# Altium PCB Mains_Board.PcbDoc
Units mil, origin at the board's own origin, x right, y up, seen from the top; angles counter-clockwise.
Board outline 2250.93 x 2125.99 mil, 2 copper layers (Top Layer, Bottom Layer), stack 61.811 mil thick; 23 components, 20 nets, 68 pads, 12 vias.
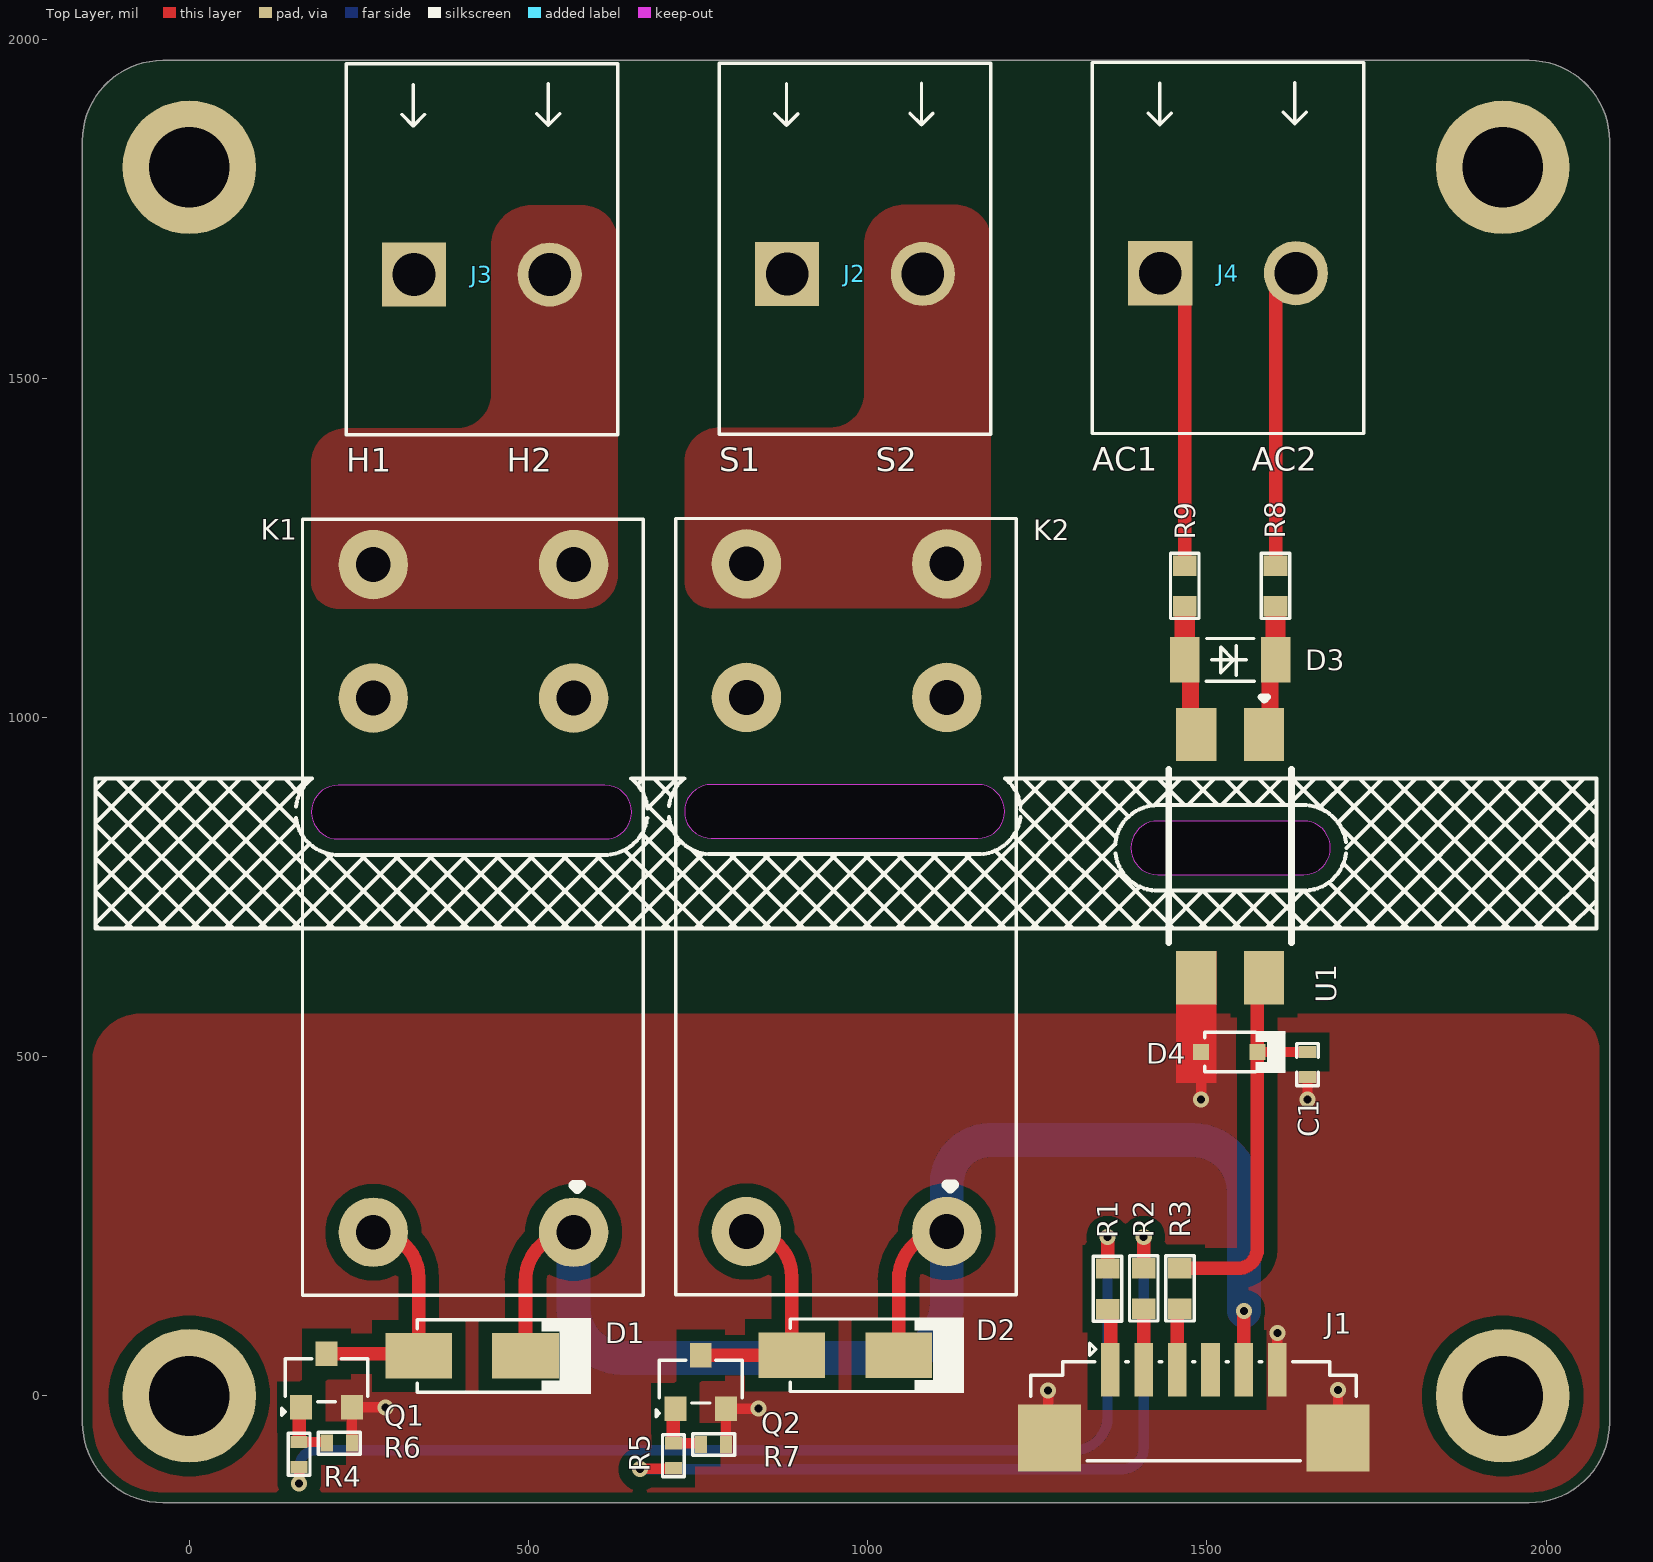
[diagram p0: Top Layer view]
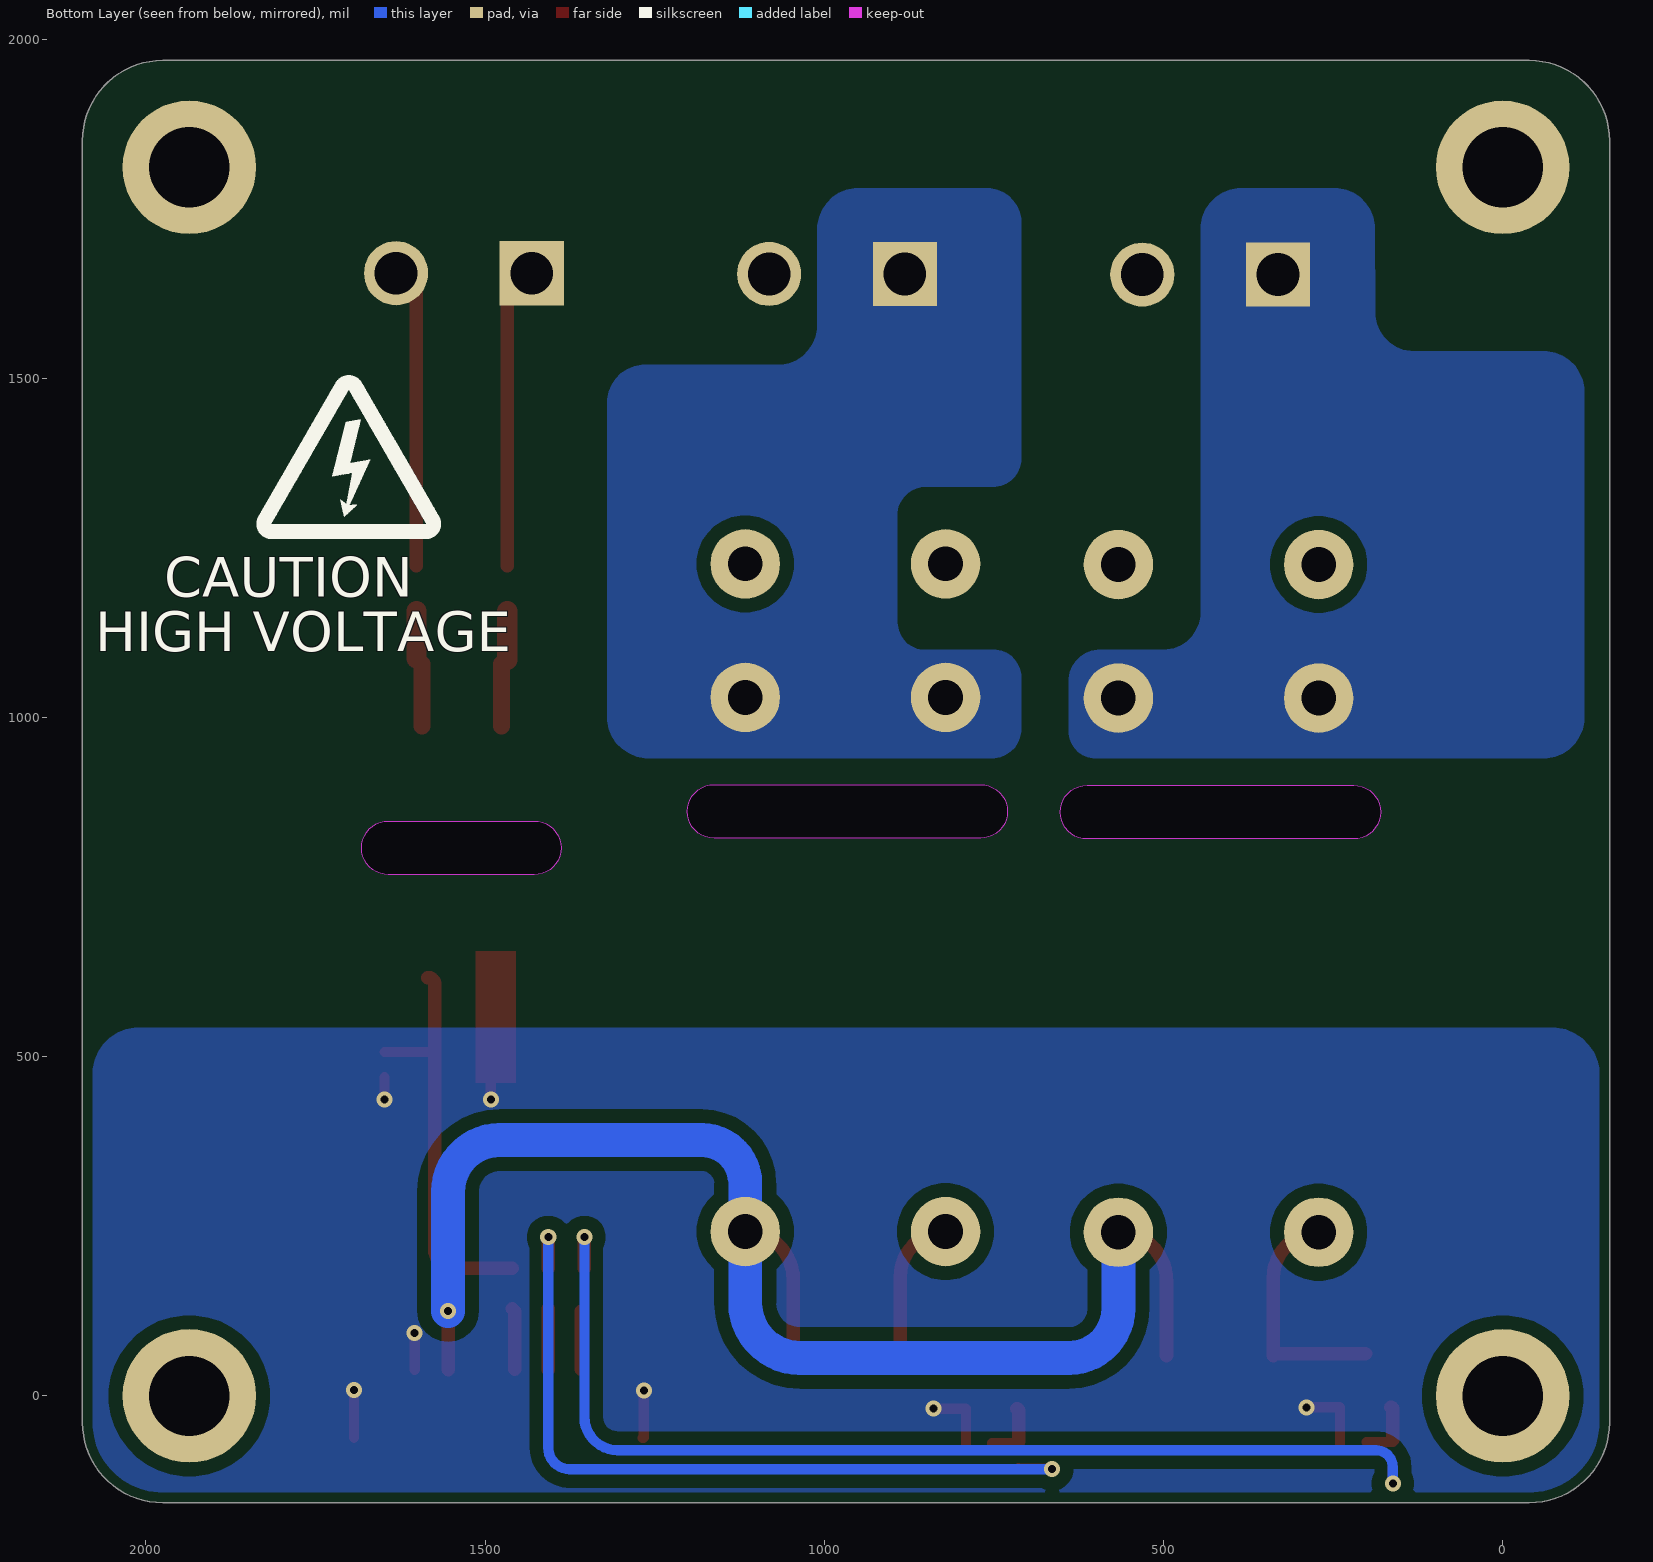
[diagram p1: Bottom Layer view, seen from below]
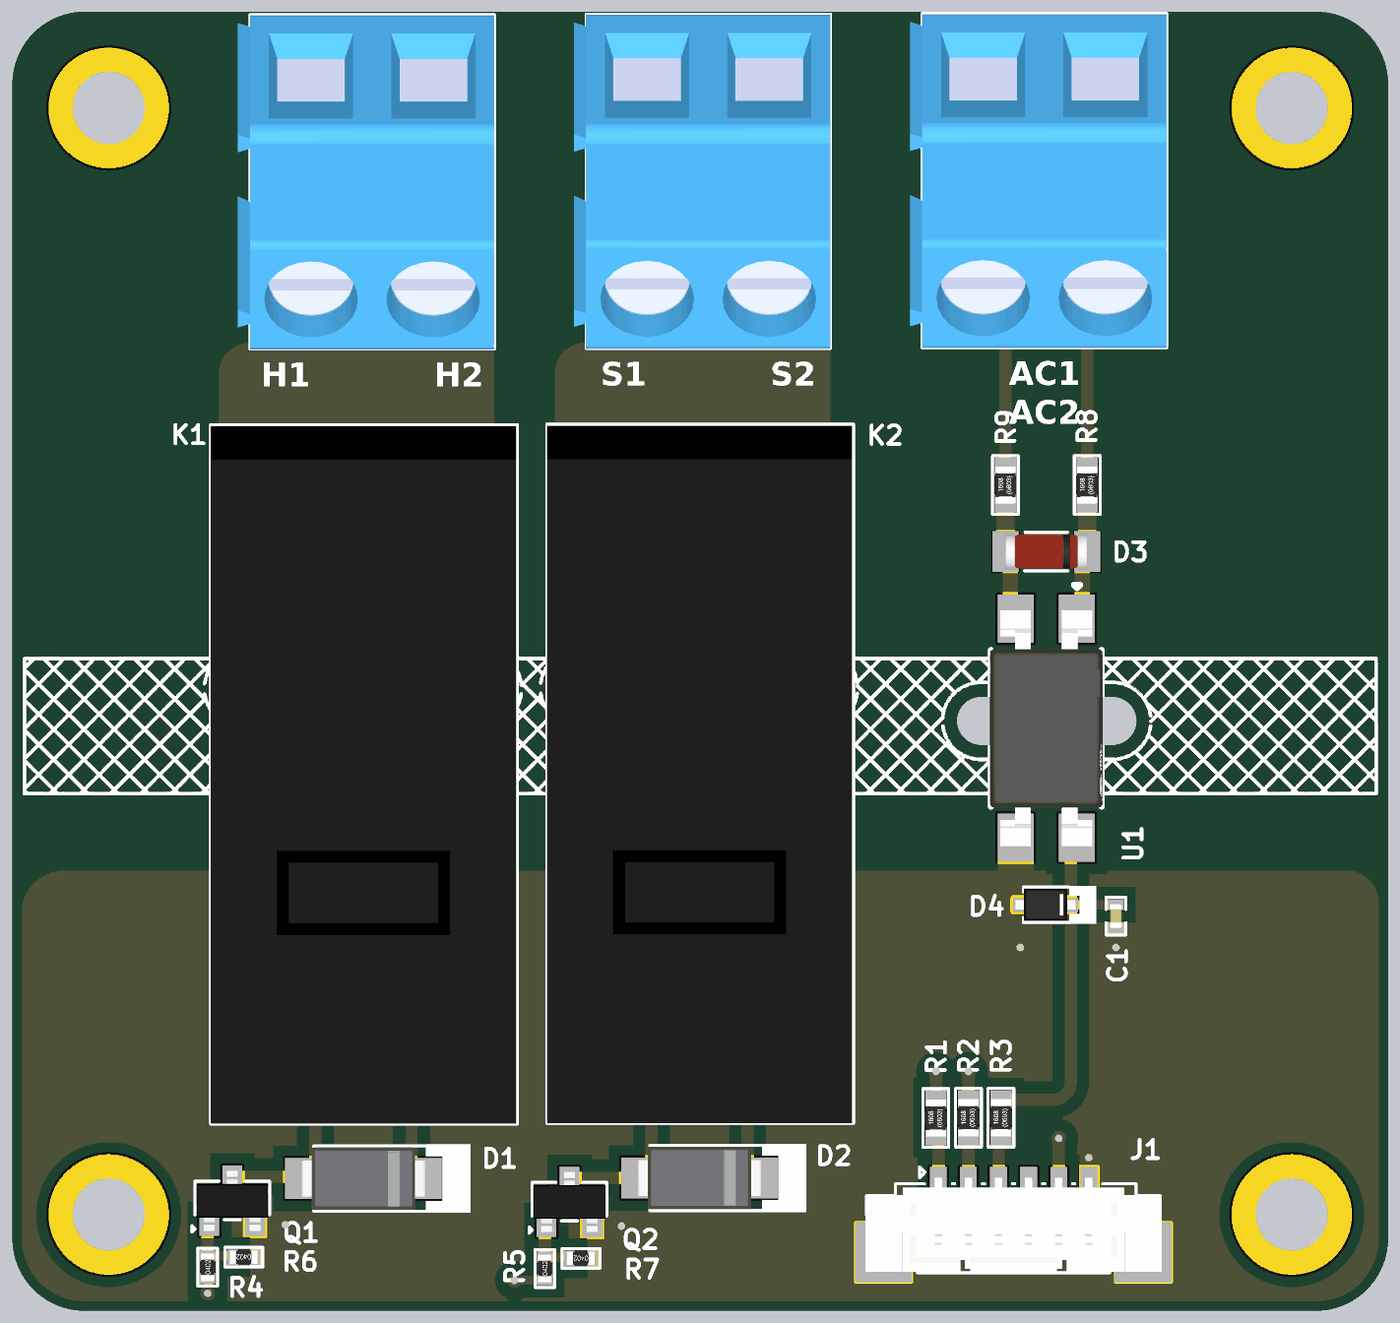
[diagram p2: 3D render of the assembled board from above, using the file's embedded part models]

## Layer stack, top to bottom
Top Solder: solder mask 0.394, Solder Resist, Dk 3.5
Top Layer: signal copper 1.378
Dielectric 1: dielectric 59.055, FR-4, Dk 4.6
Bottom Layer: signal copper 1.378
Bottom Solder: solder mask 0.394, Solder Resist, Dk 3.5

## Board outline
-157.48,-39.37 -157.48,1850.39 cw(c-39.37,1850.39) -39.37,1968.5 1975.34,1968.5 cw(c1975.34,1850.39) 2093.45,1850.39 2093.45,-39.37 cw(c1975.34,-39.37) 1975.34,-157.48 -39.37,-157.48 cw(c-39.37,-39.37)
cut-out: 219.5,820.99 612.5,820.99 ccw(c612.5,860.5) 652.01,860.5 ccw(c612.5,860.5) 612.5,900.01 219.5,900.01 ccw(c219.5,860.5) 179.98,860.5 ccw(c219.5,860.5)
cut-out: 769.5,821.99 1162.5,821.99 ccw(c1162.5,861.5) 1202.01,861.5 ccw(c1162.5,861.5) 1162.5,901.01 769.5,901.01 ccw(c769.5,861.5) 729.98,861.5 ccw(c769.5,861.5)
cut-out: 1427.5,768.35 1642.5,768.35 ccw(c1642.5,807.86) 1682.01,807.86 ccw(c1642.5,807.86) 1642.5,847.38 1427.5,847.38 ccw(c1427.5,807.86) 1387.99,807.86 ccw(c1427.5,807.86)

## Design rules (kind name [scope] priority, off if disabled: settings)
BoardOutlineClearance [All] p1: gap=0 ignorepadtopadclearanceinfootprint=FALSE except(10: Arc-OutlineEdge; 15: Poly-OutlineEdge)
Clearance [All] p1: gap=10 ignorepadtopadclearanceinfootprint=FALSE except(4: SMDPad-SMDPad; 6: Arc-SMDPad Track-SMDPad; 7: Arc-Arc Arc-Track Arc-Fill Track-Track Track-Via Track-Fill Track-Region Track-Text SMDPad-Fill SMDPad-Region THPad-THPad Fill-Fill; 8: Region-Region; 20: Arc-Poly Track-Poly SMDPad-Poly THPad-Poly Via-Poly Fill-Poly Poly-Poly Poly-Region)
ComponentClearance [All] p1: gap=0 collisioncheckmode=3 verticalgap=0 showdistances=FALSE
DiffPairsRouting Diff_RS485 [All] p1: maxlimit=7 minlimit=7 mostfreqgap=7 toplayer_minwidth=7 toplayer_maxwidth=7 toplayer_prefwidth=7 bottomlayer_minwidth=7 bottomlayer_maxwidth=7 bottomlayer_prefwidth=7 impedanceprofiledriven=TRUE impedanceprofileid={AF431588-A3C0-40A6-A26B-CB03469C8758} impedanceprofilevalue=120.000000 maxuncoupledlength=500
HoleSize [All] p1: absolutevalues=TRUE maxlimit=137.8 minlimit=1 maxpercent=80.000 minpercent=20.000
MatchedLengths [InDifferentialPairClass('DIFF_485')] p1: tolerance=1000 checknetsindiffpair=TRUE checkdiffpairvsdiffpair=FALSE checkxsignals=FALSE checkothers=FALSE
MinimumSolderMaskSliver [All] p1: minsoldermaskwidth=0
PolygonConnect [All] p1: connectstyle=Direct reliefconductorwidth=10 reliefentries=4 polygonreliefangle="90 Angle" airgapwidth=10
RoutingVias [All] p1: holewidth=11.81 width=23.62 viastyle="Through Hole" minholewidth=7.87 minwidth=15.75 maxholewidth=23.62 maxwidth=39.37
SilkToSilkClearance [All] p1: silktosilkclearance=0
SilkToSolderMaskClearance [IsPad] p1: minsilkscreentomaskgap=0 clearancetoexposedcopper=TRUE
SolderMaskExpansion [All] p1: expansion=4 istentingtop=FALSE
SupplyNets "Schematic Supply Nets_2" [InNet('VCC')] p1: voltage=0.000
SupplyNets "Schematic Supply Nets_7" [InNet('GND')] p2: voltage=0.000
Width [All] p1: maxlimit=100 minlimit=4 preferedwidth=6 minimp=50.000000 maximp=50.000000 favimp=50.000000
24 further rules are at their usual default settings.

## Components (designator, comment, footprint, x,y, rotation, side; value= is the part's Value field where it differs from the comment)
C1 "0.1uF" Cap-0402 1648.25,488.43 r90 top
D1 "STPS1H100A" SMA 416.86,58.93 r180 top
D2 "STPS1H100A" SMA 966.86,59.93 r180 top
D3 "ZMM2V7" LL-34 1534.25,1084.93 r180 top
D4 "MM3Z3V3B" SOD323F 1532.91,506.93 r0 top
J1 "HC-1.25-6PLT" HC-1.25-6PLT 1480.69,-11.69 r0 top
J2 "TB008A-508-02BE" TB008A-508-02BE 981.25,1653.93 r0 top
J3 "TB008A-508-02BE" TB008A-508-02BE 431.25,1652.93 r0 top
J4 "TB008A-508-02BE" TB008A-508-02BE 1531.25,1654.93 r0 top
K1 "G2RL-1A-E2-CV-HA DC12" "G2RL-1A-E2-CV-HA DC12" 418.86,733.36 r90 top
K2 "G2RL-1A-E2-CV-HA DC12" "G2RL-1A-E2-CV-HA DC12" 968.86,734.36 r90 top
Q1 "SI2310-HXY" SOT-23 202.25,22.56 r0 top
Q2 "SI2310-HXY" SOT-23 753.9,20.56 r0 top
R1 "0R" Res-0603 1353.65,157.91 r270 top
R2 "0R" Res-0603 1406.87,158.42 r270 top
R3 "0R" Res-0603 1460.08,158.42 r270 top
R4 "1K" Res-0402 161.93,-86.21 r90 top
R5 "1K" Res-0402 713.58,-88.21 r90 top
R6 "47K" Res-0402 221.15,-69.69 r180 top value=47kR
R7 "47K" Res-0402 772.8,-71.69 r180 top value=47kR
R8 "220K" Res-0603 1601.18,1193.93 r270 top
R9 "220K" Res-0603 1467.32,1193.93 r270 top
U1 "SFH6156-2" SFH6156-2 1534.25,795.8 r270 top

## Footprints (in the part's own frame and the unit in brackets; to place one, negate y for a bottom-side part, rotate by r counter-clockwise, add the part's x,y. Pads: shape width x height; smd on the part's side, far side on the other; paste and mask are expansions set on the pad)
Cap-0402 [mil]
  rect 18x25 smd mask+2.36: 1(-18.5,0) 2(18.5,0)
  silkscreen extent -31,-16 31,16, body extent -20,-10 20,10, height 19
"G2RL-1A-E2-CV-HA DC12" [mm]
  round 2.6 hole 1.3: 1(-12.5,-3.75) 3(7.5,-3.75) 4(12.5,-3.75) 5(12.5,3.75) 6(7.5,3.75) 8(-12.5,3.75)
  silkscreen extent -14.86,-6.35 14.2,6.4, body extent -14.86,-6.3 14.14,6.4, height 16.7
HC-1.25-6PLT [mm]
  rect 0.7x2 smd: 1(-3.125,1.277) 2(-1.875,1.275) 3(-0.625,1.275) 4(0.625,1.275) 5(1.875,1.273) 6(3.125,1.273)
  rect 2.35x2.5 smd paste+0 mask+0.05: MP1(-5.4,-1.277) MP2(5.4,-1.277)
  silkscreen extent -6.11,-2.12 6.09,2.27, body extent -6.15,-2.08 6.15,1.84, height 4.71
LL-34 [mm]
  rect 1.1x1.7 smd paste+0 mask+0.051: 1(-1.7,0) 2(1.7,0)
  silkscreen extent -0.9,-0.8 0.9,0.8, body extent -1.7,-0.74 1.7,0.74, height 1.5
Res-0402 [mil]
  rect 18x25 smd mask+2.17: 1(-18.5,0) 2(18.5,0)
  silkscreen extent -32,-17 32,16, body extent -23,-11 23,11, height 16
Res-0603 [mil]
  rect 30x35 smd: 1(-30,0) 2(30,0)
  silkscreen extent -48,-21 48,21, body extent -31,-17 31,17, height 18
SFH6156-2 [mm]
  rect 2x1.5 smd: 1(-4.55,1.27) 2(-4.55,-1.27) 3(4.55,-1.27) 4(4.55,1.27)
  silkscreen extent -5.96,-2.3 3.25,2.3, body extent -4.9,-2.35 4.9,2.35, height 3.67
SMA [mm]
  rect 2.5x1.7 smd: 1(-2,0) 2(2,0)
  silkscreen extent -4.45,-1.42 2.06,1.42, body extent -2.6,-1.3 2.6,1.3, height 2.4
SOD323F [mm]
  rect 0.6x0.6 smd: 1(-1.05,0) 2(1.05,0)
  silkscreen extent -0.91,-0.79 2.11,0.79, body extent -1.25,-0.68 1.25,0.68, height 1
SOT-23 [mm] "TRANS NPN 40V 0.6A SOT23"
  rect 0.82x0.92 smd: 1(-0.95,-1) 2(0.95,-1) 3(0,1)
  silkscreen extent -1.68,-1.3 1.55,0.81, body extent -1.5,-1.25 1.5,1.25, height 1.05
TB008A-508-02BE [mm]
  rect 2.4x2.4 / inner round 2.4 / far side rect 2.4x2.4 hole 1.6: 1(-2.54,0)
  round 2.4 hole 1.6: 2(2.54,0)
  silkscreen extent -5.08,-6 5.08,7.89, body extent -5.58,-6.02 5.08,7.87, height 15.82

## Part data
C1: library part C1005X5R1H104K050BB, "CAP CER 0.1UF 50V X5R 0402", Capacitance=100nF, Case Code (Imperial)=0402, Case Code (Metric)=1005, Dielectric=X5R, Dielectric Material=Ceramic, LCSC Part Number=C2181865, Manufacturer=TDK, Max Operating Temperature=85°C, Min Operating Temperature=-55°C, Package Quantity=1, Supplier Part Number 1=445-5942-1-ND, Tolerance=10%, Voltage=50V, Case/Package=0402, ComponentLink1Description=https://product.tdk.com/info/en/catalog/spec/mlccspec_commercial_general_midvoltage_en.pdf?src-supplier=Digi-Key, ComponentLink1URL=https://product.tdk.com/info/en/catalog/spec/mlccspec_commercial_general_midvoltage_en.pdf?src-supplier=Digi-Key, ComponentLink2Description=http://www.tdk.co.jp/tefe02/e413_c.pdf?src-supplier=Future+Electronics, ComponentLink2URL=http://www.tdk.co.jp/tefe02/e413_c.pdf?src-supplier=Future+Electronics, ComponentLink3Description=https://www.verical.com/server-webapp/html/getDatasheet?partID=743571&src-supplier=Verical, ComponentLink3URL=https://www.verical.com/server-webapp/html/getDatasheet?partID=743571&src-supplier=Verical, ComponentLink4Description=http://www.tdk.co.jp/tefe02/e412_c.pdf?src-supplier=Avnet+Europe, ComponentLink4URL=http://www.tdk.co.jp/tefe02/e412_c.pdf?src-supplier=Avnet+Europe, Construction=Flat, Depth=0.5mm, Height=0.5mm, Item Type=Capacitor, Lead Free="Lead Free", Length=1mm, Manufacturer Part Number=C1005X5R1H104K050BB, Mount="Surface Mount", Packaging="Tape and Reel", Pricing 1="1=0.12, 10=0.09, 50=0.049, 100=0.04, 500=0.02858, 1000=0.02245, 2500=0.02041, 5000=0.01878 (USD)", Radiation Hardening=No, REACH SVHC="No SVHC", Resistor Type=Ceramic, RoHS Compliant=Yes, Series=C, Stock 1=1455182, Supplier 1=Digi-Key, Termination=SMD/SMT, Thickness=0.022inch, Voltage Rating=50V, Voltage Rating (DC)=50V, Weight=2.3E-05oz, Width=0.02inch
D1 D2: "DIODE SCHOTTKY 100V 1A SMA", Average Rectified Current=1A, Case/Package=SMA, Forward Voltage=860mV, LCSC Part Number=C165701, Manufacturer=STMicroelectronics, Max Forward Surge Current (Ifsm)=50A, Max Operating Temperature=175°C, Max Repetitive Reverse Voltage (Vrrm)=100V, Max Reverse Current=4uA, Min Operating Temperature=-65°C, Package Quantity=5000, ComponentLink1Description=https://datasheet.ciiva.com/14167/cd00001304-14167861.pdf?src-supplier=Distrelec, ComponentLink1URL=https://datasheet.ciiva.com/14167/cd00001304-14167861.pdf?src-supplier=Distrelec, ComponentLink2Description=https://datasheet.ciiva.com/915/cd00001304-915848.pdf?src-supplier=Digikey, ComponentLink2URL=https://datasheet.ciiva.com/915/cd00001304-915848.pdf?src-supplier=Digikey, ComponentLink3Description=https://datasheet.ciiva.com/7964/1690209-7964154.pdf?src-supplier=Element14, ComponentLink3URL=https://datasheet.ciiva.com/7964/1690209-7964154.pdf?src-supplier=Element14, ComponentLink4Description=https://datasheet.ciiva.com/915/cd00001304-915847.pdf?src-supplier=Digikey, ComponentLink4URL=https://datasheet.ciiva.com/915/cd00001304-915847.pdf?src-supplier=Digikey, ComponentLink5Description=https://datasheet.ciiva.com/915/cd00001304-915846.pdf?src-supplier=Digikey, ComponentLink5URL=https://datasheet.ciiva.com/915/cd00001304-915846.pdf?src-supplier=Digikey, Current Rating=1A, Forward Current=1A, Height=2.03mm, Item Type=Diodes, Lead Free="Lead Free", Length=4.6mm, Manufacturer Part Number=STPS1H100A, Max Reverse Leakage Current=4uA, Max Reverse Voltage (DC)=100V, Max Surge Current=50A, Mounting Technology="Surface Mount", Output Current=1A, Packaging="Tape and Reel", Peak Non-Repetitive Surge Current=50A, Pins=2, Polarity=Standard, Pricing="1=0.34, 10=0.222, 50=0.222, 100=0.12, 1000=0.099, 10000=0.064 (USD)", Radiation Hardening=No, Reach SVHC Compliant=No, RoHS=Yes, RoHS Compliant=Yes, Series=-, Stock=7367, Supplier=Mouser, Termination=SMD/SMT, Voltage Rating (DC)=100V, Width=2.95mm
D3: "Independent Type 2.5V~2.9V 500mW 2.7V LL-34 Zener Diodes ROHS", LCSC Part Number=C2891738, Manufacturer="HXY MOSFET", Package=LL-34, ComponentLink1Description=LCSC, ComponentLink1URL=https://www.lcsc.com/product-detail/Zener-Diodes_YONGYUTAI-ZMM2V7_C2891738.html, Item Type=Diode, Manufacturer Part Number=ZMM2V7
D4: "DIODE ZENER 3.3V 200MW SOD323F", Forward Voltage=1V, LCSC Part Number=C2978865, Manufacturer="ON Semiconductor / Fairchild", Max Operating Temperature=150°C, Max Power Dissipation=200mW, Max Reverse Leakage Current=4.5uA, Min Operating Temperature=-65°C, Package Quantity=1, Supplier Part Number 1=MM3Z3V3BCT-ND, Test Current=5mA, Tolerance=2%, Working Voltage=3.3V, ComponentLink1Description=http://www.onsemi.com/pub/Collateral/MM3Z9V1B-D.pdf?src-supplier=Digi-Key, ComponentLink1URL=http://www.onsemi.com/pub/Collateral/MM3Z9V1B-D.pdf?src-supplier=Digi-Key, ComponentLink2Description=http://www.mouser.com/ds/2/149/MM3Z3V3B-187166.pdf?src-supplier=Mouser, ComponentLink2URL=http://www.mouser.com/ds/2/149/MM3Z3V3B-187166.pdf?src-supplier=Mouser, ComponentLink3Description=https://www.fairchildsemi.com/datasheets/MM/MM3Z9V1B.pdf?src-supplier=Avnet, ComponentLink3URL=https://www.fairchildsemi.com/datasheets/MM/MM3Z9V1B.pdf?src-supplier=Avnet, ComponentLink4Description=http://www.farnell.com/datasheets/1706525.pdf?src-supplier=Element14, ComponentLink4URL=http://www.farnell.com/datasheets/1706525.pdf?src-supplier=Element14, Element Configuration=Single, Height=1mm, Impedance=89R, Item Type=Diode, Lead Free="Lead Free", Length=1.3mm, Manufacturer Part Number=MM3Z3V3B, Mount="Surface Mount", Number of Pins=2, Packaging="Tape and Reel", Peak Reverse Current=4.5uA, Power Dissipation=200mW, Pricing 1="1=0.22, 10=0.18, 100=0.0956, 500=0.06288, 1000=0.04276 (USD)", Radiation Hardening=No, REACH SVHC="No SVHC", Stock 1=473644, Supplier 1=Digi-Key, Voltage Tolerance=2%, Weight=0.0276g, Width=1.7mm, Zener Voltage=3.3V
J1: "1x6P 6P PicoBlade(MX 1.25) Tin 6 -25℃~+85℃ 2A 1 1.25mm Brass Surface Mount,Vertical SMD,P=1.25mm Wire To Board Connector ROHS", LCSC Part Number=C2845392, Manufacturer=HCTL, Package=SMD,P=1.25mm, ComponentLink1Description=LCSC, ComponentLink1URL=https://lcsc.com/product-detail/Wire-To-Board-Connector_HCTL-HC-1-25-6PLT_C2845392.html?s_z=n_HC-1.25-6PLT, Item Type=Connector, Manufacturer Part Number=HC-1.25-6PLT
J2 J3 J4: "TERMINAL BLOCK, SCREW TYPE, 5.08", Color=Blue, Current Rating=16A, Manufacturer="Same Sky", Max Operating Temperature=105°C, Min Operating Temperature=-40°C, Supplier Part Number=102-6213-ND, Voltage Rating=300V, Approvals="CE, IEC, UL, cUL", ComponentLink1Description=https://datasheet.octopart.com:443/TB008A-508-02BE-Same-Sky-datasheet-181920260.pdf?src-supplier=Same+Sky, ComponentLink1URL=https://datasheet.octopart.com:443/TB008A-508-02BE-Same-Sky-datasheet-181920260.pdf?src-supplier=Same+Sky, ComponentLink2Description=https://datasheet.octopart.com:443/TB008A-508-02BE-CUI-Devices-datasheet-175928141.pdf?src-supplier=Same+Sky, ComponentLink2URL=https://datasheet.octopart.com:443/TB008A-508-02BE-CUI-Devices-datasheet-175928141.pdf?src-supplier=Same+Sky, ComponentLink3Description=https://datasheet.octopart.com:443/TB008A-508-02BE-CUI-Devices-datasheet-144794964.pdf?src-supplier=Same+Sky, ComponentLink3URL=https://datasheet.octopart.com:443/TB008A-508-02BE-CUI-Devices-datasheet-144794964.pdf?src-supplier=Same+Sky, ComponentLink4Description=https://datasheet.octopart.com:443/TB008A-508-02BE-CUI-Devices-datasheet-180438533.pdf?src-supplier=IHS, ComponentLink4URL=https://datasheet.octopart.com:443/TB008A-508-02BE-CUI-Devices-datasheet-180438533.pdf?src-supplier=IHS, ComponentLink5Description=https://datasheet.octopart.com:443/TB008A-508-02BE-Same-Sky-datasheet-182881448.pdf?src-supplier=Electro+Sonic, ComponentLink5URL=https://datasheet.octopart.com:443/TB008A-508-02BE-Same-Sky-datasheet-182881448.pdf?src-supplier=Electro+Sonic, ComponentLink6Description=https://datasheet.octopart.com:443/TB008A-508-02BE-CUI-Devices-datasheet-154730749.pdf?src-supplier=Electro+Sonic, ComponentLink6URL=https://datasheet.octopart.com:443/TB008A-508-02BE-CUI-Devices-datasheet-154730749.pdf?src-supplier=Electro+Sonic, ComponentLink7Description=https://datasheet.octopart.com:443/TB008A-508-02BE-CUI-Devices-datasheet-175927974.pdf?src-supplier=CUI+Devices+SCT, ComponentLink7URL=https://datasheet.octopart.com:443/TB008A-508-02BE-CUI-Devices-datasheet-175927974.pdf?src-supplier=CUI+Devices+SCT, ComponentLink8Description=https://datasheet.octopart.com:443/TB008A-508-02BE-CUI-Devices-datasheet-142371924.pdf?src-supplier=Future+Electronics, ComponentLink8URL=https://datasheet.octopart.com:443/TB008A-508-02BE-CUI-Devices-datasheet-142371924.pdf?src-supplier=Future+Electronics, ComponentLink9Description=https://datasheet.octopart.com:443/TB008A-508-02BE-Same-Sky-datasheet-182050257.pdf?src-supplier=Future+Electronics, ComponentLink9URL=https://datasheet.octopart.com:443/TB008A-508-02BE-Same-Sky-datasheet-182050257.pdf?src-supplier=Future+Electronics, ComponentLink10Description=https://datasheet.octopart.com:443/TB008A-508-02BE-CUI-Devices-datasheet-175928506.pdf?src-supplier=Future+Electronics, ComponentLink10URL=https://datasheet.octopart.com:443/TB008A-508-02BE-CUI-Devices-datasheet-175928506.pdf?src-supplier=Future+Electronics, ComponentLink11Description=https://datasheet.octopart.com:443/TB008A-508-02BE-CUI-Devices-datasheet-147843969.pdf?src-supplier=Future+Electronics, ComponentLink11URL=https://datasheet.octopart.com:443/TB008A-508-02BE-CUI-Devices-datasheet-147843969.pdf?src-supplier=Future+Electronics, ComponentLink12Description=https://octopart.com:443/opatz8j6/c1?t=70RcvCe5ZkRgGfEt3V6vu9Rs4fRjMXZXdN7o_jKjc1dIStjs0IdWQTWbo2m4XJFZN-ZP8jrAm8ZplrmsDRNZWu5vD1uRxoUEzG546i7xsfV2Hlacn1XvUR2XbUoQGro5ohP2MwvVjf8PoqdhdL5ostV4A3wznZJYIF3cjV4w5lqdbJSsZe_bWwCbg-0xN0VRUvfB1EMY8Vje3Eupa8s9ZFT71pkE5p7-eHFbrk2At8AAZTx0zaGgq3cGzzCo7b3plQZDv0g9EsQyQUqhBC4JyFJJTeTHRWNNhUkmN73PD8OCyLOPLnegennELhgJeyY7HD7r-bGsAjSnjBwQDgR4SNS6WopDa7PwSknd4UaR&src-supplier=Compliance+Statements, ComponentLink12URL=https://octopart.com:443/opatz8j6/c1?t=70RcvCe5ZkRgGfEt3V6vu9Rs4fRjMXZXdN7o_jKjc1dIStjs0IdWQTWbo2m4XJFZN-ZP8jrAm8ZplrmsDRNZWu5vD1uRxoUEzG546i7xsfV2Hlacn1XvUR2XbUoQGro5ohP2MwvVjf8PoqdhdL5ostV4A3wznZJYIF3cjV4w5lqdbJSsZe_bWwCbg-0xN0VRUvfB1EMY8Vje3Eupa8s9ZFT71pkE5p7-eHFbrk2At8AAZTx0zaGgq3cGzzCo7b3plQZDv0g9EsQyQUqhBC4JyFJJTeTHRWNNhUkmN73PD8OCyLOPLnegennELhgJeyY7HD7r-bGsAjSnjBwQDgR4SNS6WopDa7PwSknd4UaR&src-supplier=Compliance+Statements, ComponentLink13Description=https://octopart.com:443/opatz8j6/c1?t=Uo7J4IF8yNdenAOC46u8Tj87WKOsK2A7c2vs8Sa5WYpsHicIfMoXbTSbdSiyOVgpxAIJCnEdsRMUssp9co8EivZcQamcZCig1rv7D-Ug8PwU11654nZt9VBHHEO9J9O1TmTLkeOA50viz6XbUTUcFOxEIWFtOIpsQudSLNpXl0qwCRhM7cqCRnP2WYjdfnel41QgPMBd0OmGtB5n4xaHO6yfR0O84tGT4DFJu17jeSMsdcHZCnKlQJPS09wnjUoIgC30PVYN35xN_xndXGhnfduxGQWssTNdQ2Ew4lLPFXECETpUa_FU3_NIDCJhBmvudBKdEuF4t1En-YL9AhFUeE1LU0Iszw0AVyDT8Hn1nDsKYQ&src-supplier=Compliance+Statements, ComponentLink13URL=https://octopart.com:443/opatz8j6/c1?t=Uo7J4IF8yNdenAOC46u8Tj87WKOsK2A7c2vs8Sa5WYpsHicIfMoXbTSbdSiyOVgpxAIJCnEdsRMUssp9co8EivZcQamcZCig1rv7D-Ug8PwU11654nZt9VBHHEO9J9O1TmTLkeOA50viz6XbUTUcFOxEIWFtOIpsQudSLNpXl0qwCRhM7cqCRnP2WYjdfnel41QgPMBd0OmGtB5n4xaHO6yfR0O84tGT4DFJu17jeSMsdcHZCnKlQJPS09wnjUoIgC30PVYN35xN_xndXGhnfduxGQWssTNdQ2Ew4lLPFXECETpUa_FU3_NIDCJhBmvudBKdEuF4t1En-YL9AhFUeE1LU0Iszw0AVyDT8Hn1nDsKYQ&src-supplier=Compliance+Statements, ComponentLink14Description=https://octopart.com:443/opatz8j6/c1?t=QvKslLqyPFzau17NptgVLNRcuMhYIDBdCODdkHqrYmlyYaojLdNAUnoimpM8kJVdayLtCnbbKOALirt3kAy58b19LXjk0_7F41XvMIDT0eRXxnt9UHZUhX802G-ZzTsQIZnaFSbz4MEhjhtI2qswXHCzfmb8sqF0HXUhYlN6-rqlzfA-OyFj0jZaaAfm4-lvU9uPpsocCV1oKDEwT57xEscWeOARtAbVwqthJApLrBmKsw-5DWDhVMlxDbVvBXDO0fpzQdRNXWzvV5iRUvpPqWvudAW3YO1yLdtS--LwTFp95_TZ35xs_jHFthiTFDMmHALKuZGPmqbJgedvZH3Zk3g47VKlaCUtWvKEaHE3&src-supplier=Compliance+Statements, ComponentLink14URL=https://octopart.com:443/opatz8j6/c1?t=QvKslLqyPFzau17NptgVLNRcuMhYIDBdCODdkHqrYmlyYaojLdNAUnoimpM8kJVdayLtCnbbKOALirt3kAy58b19LXjk0_7F41XvMIDT0eRXxnt9UHZUhX802G-ZzTsQIZnaFSbz4MEhjhtI2qswXHCzfmb8sqF0HXUhYlN6-rqlzfA-OyFj0jZaaAfm4-lvU9uPpsocCV1oKDEwT57xEscWeOARtAbVwqthJApLrBmKsw-5DWDhVMlxDbVvBXDO0fpzQdRNXWzvV5iRUvpPqWvudAW3YO1yLdtS--LwTFp95_TZ35xs_jHFthiTFDMmHALKuZGPmqbJgedvZH3Zk3g47VKlaCUtWvKEaHE3&src-supplier=Compliance+Statements, ComponentLink15Description=https://octopart.com:443/opatz8j6/c1?t=vaYY41CogfnopSfDOPxoaqGeCdGNbbMVVihVh9piZThYC4z5UdzLQjuTDbTJQBTosCtHjK1U8s3WuliWmK31H20qTGz1dkr0vY7KPWk-lwdRYh6T0AVJBxjWCi0eVjFp9VnnwA-vZFto2L6_FJ-1JJOZC7c21m4C6LgLcEGoiZY5ivV0bdaUH14NZNWQcfXhucKYp6KsuPDjo6IvsvVydEIyl4r3dmRXALVohKm2RtfKZd3dTcnpmcifjmEzWhR-u4uu0vOGtKFb8OyaUtZ3gXgC8hliX2ctByKhLk-vsmWP8rGswQgdKk_F7i01fLK7QHLl5nXUFhOop_anT0dafluEmPu9S4IjVmRqgao-gzkWkw&src-supplier=Compliance+Statements, ComponentLink15URL=https://octopart.com:443/opatz8j6/c1?t=vaYY41CogfnopSfDOPxoaqGeCdGNbbMVVihVh9piZThYC4z5UdzLQjuTDbTJQBTosCtHjK1U8s3WuliWmK31H20qTGz1dkr0vY7KPWk-lwdRYh6T0AVJBxjWCi0eVjFp9VnnwA-vZFto2L6_FJ-1JJOZC7c21m4C6LgLcEGoiZY5ivV0bdaUH14NZNWQcfXhucKYp6KsuPDjo6IvsvVydEIyl4r3dmRXALVohKm2RtfKZd3dTcnpmcifjmEzWhR-u4uu0vOGtKFb8OyaUtZ3gXgC8hliX2ctByKhLk-vsmWP8rGswQgdKk_F7i01fLK7QHLl5nXUFhOop_anT0dafluEmPu9S4IjVmRqgao-gzkWkw&src-supplier=Compliance+Statements, Height=15.82mm, Item Type="Terminal Blocks", Lifecycle Status=Production, Manufacturer Part Number=TB008A-508-02BE, Mounting Technology=Screw, Number of Contacts=2, Number of Levels=1, Number of Rows=1, Pitch=5.08mm, Pricing="1=0.61, 10=0.451, 25=0.3932, 50=0.3542, 100=0.3198, 250=0.282, 500=0.25896, 1200=0.23595, 6000=0.20759 (USD)", RoHS=Compliant, Stock=2734, Supplier=DigiKey, Width=13.89mm, Wire/Cable Gauge=12AWG
K1 K2: "RELAY GEN PURPOSE SPST 23A 12V", Coil Resistance=360R, Contact Resistance=100mR, Supplier Part Number=Z13015-ND, Category="Power Relays", ComponentLink1Description=LCSC, ComponentLink2Description=https://media.digikey.com/pdf/Data%20Sheets/Omron%20PDFs/G2RL-1A-E2-CV-HA%20DC5.pdf?src-supplier=Digi-Key, ComponentLink2URL=https://media.digikey.com/pdf/Data%20Sheets/Omron%20PDFs/G2RL-1A-E2-CV-HA%20DC5.pdf?src-supplier=Digi-Key, ComponentLink3Description=https://datasheet.octopart.com/G2RL-1A-E2-CV-HA-DC12-Omron-datasheet-27910337.pdf?src-supplier=TME, ComponentLink3URL=https://datasheet.octopart.com/G2RL-1A-E2-CV-HA-DC12-Omron-datasheet-27910337.pdf?src-supplier=TME, Item Type=RELAY, Pricing="1=4.97, 10=4.657, 25=4.14, 40=3.933, 80=3.726, 230=3.312, 500=3.105, 1000=2.89799 (USD)", RoHS=No, Stock=2658, Supplier=Digi-Key
Q1 Q2: "60V 3A 1.7W 86mΩ@10V,3A N Channel SOT-23(TO-236) MOSFETs ROHS", LCSC Part Number=C4748716, Manufacturer=HXY, Package=SOT-23(TO-236), ComponentLink1Description=LCSC, ComponentLink1URL=https://www.lcsc.com/product-detail/MOSFETs_span-style-background-color-ff0-HXY-span-MOSFET-SI2310-HXY_C4748716.html, Item Type=Mosfet, Manufacturer Part Number=SI2310-HXY
R1 R2 R3: library part RC0603JR-070RL, "RES 0 OHM JUMPER 1/10W 0603", Case Code (Imperial)=0603, Case Code (Metric)=1608, LCSC Part Number=C95177, Manufacturer=Yageo, Max Operating Temperature=155°C, Max Power Dissipation=100mW, Min Operating Temperature=-55°C, Package Quantity=5000, Resistance=0mR, Resistance Tolerance=5%, Resistor Type="Thick Film", Supplier Part Number 1=311-0.0GRCT-ND, Temperature Coefficient=200ppm/°C, Tolerance=1%, Voltage Rating=50V, Case/Package=0603, Category="Chip SMD Resistors", Construction=Rectangular, Contact Plating=Tin,Matte, Depth=0.8mm, Features="Moisture Resistant", Height=0.45mm, Item Type=Resistor, Lead Free="Lead Free", Length=1.6mm, Manufacturer Part Number=RC0603JR-070RL, Military Standard=Not, Number of Pins=2, Number of Terminations=2, Packaging="Tape and Reel", Power Rating=100mW, Pricing 1="1=0.10000, 10=0.01700, 25=0.01240, 50=0.00960, 100=0.00700, 250=0.00536, 500=0.00430, 1000=0.00316 (USD)", Radiation Hardening=No, Reach SVHC Compliant="No SVHC", RoHS=Yes, RoHS Compliant=Yes, Series=RC, Size Code=0603, Stock 1=18081776, Supplier 1=Digi-Key, Technology="THICK FILM", Termination=SMD/SMT, Voltage Rating (DC)=50V, Width=0.8mm
R4 R5: library part RC0402JR-071KL, "RES 1K OHM 5% 1/16W 0402", Case Code (Imperial)=0402, Case Code (Metric)=1005, LCSC Part Number=C105637, Manufacturer=Yageo, Max Operating Temperature=155°C, Max Power Dissipation=63mW, Min Operating Temperature=-55°C, Package Quantity=1, Power Rating=62.5mW, Resistance=1kR, Resistance Tolerance=5%, Resistor Type="Thick Film", Supplier Part Number 1=311-1.0KJRCT-ND, Temperature Coefficient=100ppm/°C, Voltage Rating=50V, Case/Package=0402, Category="Chip SMD Resistors", ComponentLink1Description=https://datasheet.ciiva.com/7983/1018594-7983558.pdf?src-supplier=Element14, ComponentLink1URL=https://datasheet.ciiva.com/7983/1018594-7983558.pdf?src-supplier=Element14, ComponentLink2Description=https://datasheet.ciiva.com/2452/pyu-r-int-thick-7-2452756.pdf?src-supplier=Digi-Key, ComponentLink2URL=https://datasheet.ciiva.com/2452/pyu-r-int-thick-7-2452756.pdf?src-supplier=Digi-Key, ComponentLink3Description=https://datasheet.ciiva.com/2452/pyu-r-int-thick-7-2452757.pdf?src-supplier=Digi-Key, ComponentLink3URL=https://datasheet.ciiva.com/2452/pyu-r-int-thick-7-2452757.pdf?src-supplier=Digi-Key, ComponentLink4Description=https://datasheet.ciiva.com/2452/pyu-r-int-thick-7-2452755.pdf?src-supplier=Digi-Key, ComponentLink4URL=https://datasheet.ciiva.com/2452/pyu-r-int-thick-7-2452755.pdf?src-supplier=Digi-Key, ComponentLink5Description=https://datasheet.ciiva.com/7850/1018594-7850170.pdf?src-supplier=Element14, ComponentLink5URL=https://datasheet.ciiva.com/7850/1018594-7850170.pdf?src-supplier=Element14, ComponentLink6Description=https://datasheet.ciiva.com/7850/1018594-7850171.pdf?src-supplier=Element14, ComponentLink6URL=https://datasheet.ciiva.com/7850/1018594-7850171.pdf?src-supplier=Element14, ComponentLink7Description=https://datasheet.ciiva.com/17081/pyu-rc0402-51-rohs-l-6-r-17081438.pdf?src-supplier=Future+Electronics, ComponentLink7URL=https://datasheet.ciiva.com/17081/pyu-rc0402-51-rohs-l-6-r-17081438.pdf?src-supplier=Future+Electronics, Construction=Rectangular, Depth=0.5mm, Features="Moisture Resistant", Height=0.016inch, Item Type=Resistor, Lead Free="Lead Free", Length=0.039inch, Manufacturer Part Number=RC0402JR-071KL, Military Standard=Not, Number of Terminations=2, Packaging="Tape and Reel", Pricing 1="1=0.10000, 10=0.01300, 100=0.00540, 1000=0.00244, 2500=0.00212, 5000=0.00175 (USD)", REACH SVHC="No SVHC", RoHS=Yes, RoHS Compliant=Yes, Series=RC, Size Code=0402, Stock 1=452315, Supplier 1=Digi-Key, Termination=SMD/SMT, Tolerance=5%, Width=0.02inch
R6 R7: library part RT0402BRE0747KL, "RES SMD 47K OHM 0.1% 1/16W 0402", Case Code (Metric)=3668CaseCodeMetric, Case/Package=0402, LCSC Part Number=C853293, Manufacturer=Yageo, Max Operating Temperature=155°C, Max Power Dissipation=63mW, Min Operating Temperature=-55°C, Power Rating=62.5mW, Supplier Part Number=YAG4391CT-ND, Temperature Coefficient=50ppm/°C, Tolerance=0.1%, Voltage Rating=50V, Category="Chip SMD Resistors", ComponentLink1Description=https://datasheet.octopart.com/RT0402BRE0747KL-Yageo-datasheet-169971040.pdf?src-supplier=Future+Electronics, ComponentLink1URL=https://datasheet.octopart.com/RT0402BRE0747KL-Yageo-datasheet-169971040.pdf?src-supplier=Future+Electronics, ComponentLink2Description=http://www.yageo.com/documents/recent/PYu-RT_1-to-0.01_RoHS_L_9.pdf?src-supplier=Digikey, ComponentLink2URL=http://www.yageo.com/documents/recent/PYu-RT_1-to-0.01_RoHS_L_9.pdf?src-supplier=Digikey, ComponentLink3Description=https://www.yageo.com/upload/media/product/productsearch/datasheet/rchip/PYu-RT_1-to-0.01_RoHS_L_12.pdf?src-supplier=Digikey, ComponentLink3URL=https://www.yageo.com/upload/media/product/productsearch/datasheet/rchip/PYu-RT_1-to-0.01_RoHS_L_12.pdf?src-supplier=Digikey, Height=350um, Item Type=Resistor, Lead Free="Lead Free", Length=1mm, Manufacturer Part Number=RT0402BRE0747KL, Number of Terminations=2, Pricing="1=0.16, 10=0.121, 50=0.0958, 100=0.0858, 500=0.06536, 1000=0.05776, 5000=0.0428 (USD)", RoHS=Yes, RoHS Compliant=Yes, Series=RT, Stock=11654, Supplier=Digikey, Voltage Rating (DC)=50V, Width=500um
R8 R9: library part RC0603FR-07220KL, "RES 220K OHM 1% 1/10W 0603", Case Code (Imperial)=0603, Case Code (Metric)=1608, LCSC Part Number=C123420, Manufacturer=Yageo, Max Operating Temperature=155°C, Max Power Dissipation=100mW, Min Operating Temperature=-55°C, Package Quantity=1, Resistance=220kR, Resistance Tolerance=1%, Resistor Type="Thick Film", Temperature Coefficient=100ppm/°C, Voltage Rating=50V, Case/Package=0603, Category="Chip SMD Resistors", ComponentLink1Description=https://datasheet.ciiva.com/11808/0900766b80f96399-11808161.pdf?src-supplier=RSComponents, ComponentLink1URL=https://datasheet.ciiva.com/11808/0900766b80f96399-11808161.pdf?src-supplier=RSComponents, ComponentLink2Description=https://datasheet.ciiva.com/46412/443971-46412845.pdf?src-supplier=Element14, ComponentLink2URL=https://datasheet.ciiva.com/46412/443971-46412845.pdf?src-supplier=Element14, ComponentLink3Description=https://datasheet.ciiva.com/2453/pyu-r-int-thick-7-2453965.pdf?src-supplier=Digi-Key, ComponentLink3URL=https://datasheet.ciiva.com/2453/pyu-r-int-thick-7-2453965.pdf?src-supplier=Digi-Key, ComponentLink4Description=https://datasheet.ciiva.com/2453/pyu-r-int-thick-7-2453966.pdf?src-supplier=Digi-Key, ComponentLink4URL=https://datasheet.ciiva.com/2453/pyu-r-int-thick-7-2453966.pdf?src-supplier=Digi-Key, ComponentLink5Description=https://datasheet.ciiva.com/2453/pyu-r-int-thick-7-2453964.pdf?src-supplier=Digi-Key, ComponentLink5URL=https://datasheet.ciiva.com/2453/pyu-r-int-thick-7-2453964.pdf?src-supplier=Digi-Key, ComponentLink6Description=https://datasheet.ciiva.com/7746/443971-7746299.pdf?src-supplier=Element14, ComponentLink6URL=https://datasheet.ciiva.com/7746/443971-7746299.pdf?src-supplier=Element14, ComponentLink7Description=https://datasheet.ciiva.com/7746/443971-7746298.pdf?src-supplier=Element14, ComponentLink7URL=https://datasheet.ciiva.com/7746/443971-7746298.pdf?src-supplier=Element14, Depth=0.8mm, Features="Moisture Resistant", Height=0.022inch, Item Type=Resistor, Lead Free="Lead Free", Length=0.063inch, Manufacturer Part Number=RC0603FR-07220KL, Number of Pins=2, Number of Terminations=2, Packaging="Tape and Reel", Power Rating=100mW, Pricing 1="5000=0.00240 (USD)", Reach SVHC Compliant=Yes, RoHS=Yes, RoHS Compliant=Yes, Series=RC, Size Code=0603, Stock 1=1565000, Supplier 1="Arrow Electronics", Supplier Part Number 1=RC0603FR-07220KL, Technology="THICK FILM", Termination=SMD/SMT, Tolerance=1%, Voltage Rating (DC)=50V, Width=0.031inch
U1: "OPTOISOLATOR 5.3KV TRANS 4SMD", LCSC Part Number=C5156027, Manufacturer=Vishay, Item Type=IC, Manufacturer Part Number=SFH6156-2, Pricing="1=0.56, 10=0.37, 50=0.37, 100=0.253, 1000=0.218, 10000=0.217 (USD)", RoHS=No, Stock=11480, Supplier=Mouser

## Free pads (board coordinates)
  round 196.85 hole 118.11: MH(0,0) MH(0,1811.02) MH(1935.97,0) MH(1935.97,1811.02)

## Via types
v1: diameter 23.62, hole 11.81, Top Layer to Bottom Layer, tented both sides, 12 vias

## Nets (pads, with @x,y where several pads share a name; then routed paths per layer and width w, separated by ;. In a path a pad name is that pad's centre, name@x,y a point inside that pad or via, vN(x,y) a via of type N, cw(c..) or ccw(c..) an arc to the next point about the centre after c; other vN are vias at no path point)
AC_HEATER: D1.2 K1.8 Q1.3 | length 358.1
  Top Layer w20: Q1.3 335.12,61.93 cw(c335.12,58.93) D1.2 338.12,174.34 ccw(c271.22,174.34) K1.8
AC_HEATER_O: R1.1 R4.1 | length 1594.8
  Top Layer w15: R4.1 v1(161.93,-128.93) ccw(c163,-128.93) v1@163,-130
  Top Layer w20: R1.1 v1(1353.65,234)
  Bottom Layer w15: v1(161.93,-128.93) 161.93,-104.96 cw(c186.88,-104.96) 186.88,-80 1304.37,-80 ccw(c1304.37,-30.73) 1353.65,-30.73 v1(1353.65,234)
AC_SOLINOID: D2.2 K2.8 Q2.3 | length 354.7
  Top Layer w20: Q2.3 D2.2 888.12,175.34 ccw(c821.22,175.34) K2.8
AC_SOLINOID_O: R2.1 R5.1 | length 1167
  Top Layer w15: v1(664,-108) 664.65,-107.35 712.93,-107.35 R5.1
  Top Layer w20: R2.1 v1(1406.87,234)
  Bottom Layer w15: v1(664,-108) 1375.26,-108 ccw(c1375.26,-76.39) 1406.87,-76.39 v1(1406.87,234)
ACV_PRESENT: C1.2 D4.2 R3.1 U1.4 | length 610.8
  Top Layer w15: D4.2 C1.2
  Top Layer w20: R3.1 1460.08,187.91 1545.47,187.91 ccw(c1545.47,216.69) 1574.25,216.69 D4.2 1574.25,606.67 cw(c1584.25,606.67) U1.4
GND: C1.1 D4.1 J1.6 J1.MP1 J1.MP2 Q1.2 Q2.2 R6.1 R7.1 U1.3 | length 614.9
  Top Layer w15: R6.1 Q1.2 v1(288.91,-16.81) ; R7.1 Q2.2 v1(838.91,-18.81) ; v1(1266,8) 1266,-59.86 ccw(c1268.09,-59.86) J1.MP1 ; 1484.25,520.02 1487.26,517.01 1487.26,511.24 D4.1 v1(1491.57,437) ; J1.6 v1(1603.72,93) ; v1(1648.25,437) C1.1 ; J1.MP2 v1(1693.29,9)
  Top Layer w30: 1484.25,520.02 U1.3
HEATER_1: J3.1 K1.3 K1.6
HEATER_2: J3.2 K1.4 K1.5
NetD3_1: D3.1 R8.2 U1.1 | length 174
  Top Layer w20: D3.1@1592.95,1078.7 ccw(c1592.95,1086.93) D3.1@1601.18,1086.93
  Top Layer w25: U1.1@1592.95,987.63 D3.1@1592.95,1078.7
  Top Layer w30: D3.1@1601.18,1086.93 R8.2@1601.18,1156.97
NetD3_2: D3.2 R9.2 U1.2 | length 163.1
  Top Layer w25: U1.2@1475.55,987.63 D3.2@1475.55,1078.7
  Top Layer w30: D3.2 R9.2@1467.32,1156.97
NetJ1_1: J1.1 R1.2 | length 85.9
  Top Layer w20: J1.1@1358.15,39.07 R1.2@1358.15,124.97
NetJ1_2: J1.2 R2.2 | length 89.9
  Top Layer w20: J1.2 R2.2
NetJ1_3: J1.3 R3.2 | length 90.8
  Top Layer w20: J1.3@1456.58,39.02 1456.58,124.92 R3.2
NetJ4_1: J4.1 R9.1 | length 451.6
  Top Layer w20: J4.1 cw(c1431.25,1618.86) 1467.32,1618.86 R9.1
NetJ4_2: J4.2 R8.1 | length 448.2
  Top Layer w20: R8.1 1601.18,1624.86 cw(c1631.25,1624.86) J4.2
NetQ1_1: Q1.1 R4.2 R6.2 | length 88.1
  Top Layer w15: R4.2 R6.2@200.67,-67.71
  Top Layer w20: R4.2@161.93,-64.52 161.93,-19.74 cw(c164.85,-19.74) Q1.1
NetQ2_1: Q2.1 R5.2 R7.2 | length 88.1
  Top Layer w15: R5.2 R7.2@752.32,-69.71
  Top Layer w20: R5.2@713.58,-66.52 713.58,-21.74 cw(c716.5,-21.74) Q2.1
SOLINOID_1: J2.1 K2.3 K2.6
SOLINOID_2: J2.2 K2.4 K2.5
VCC: D1.1 D2.1 J1.5 K1.1 K2.1 | length 2152.7
  Top Layer w20: D1.1 495.6,170.34 cw(c566.5,170.34) K1.1 ; D2.1 1045.6,171.34 cw(c1116.5,171.34) K2.1 ; J1.5 v1(1554.51,124.92)
  Bottom Layer w50: K1.1 566.5,128.62 ccw(c639.12,128.62) 639.12,56 1035.9,56 ccw(c1035.9,136.6) 1116.5,136.6 1116.5,313.13 cw(c1180.37,313.13) 1180.37,377 1478.73,377 cw(c1478.73,301.23) 1554.51,301.23 v1(1554.51,124.92)
pads on no net: J1.4

## Polygon pours and split planes (outlines as drawn)
SOLINOID_2 on Top Layer "NONET_L-01_P-001" (solid, pour order 8): 730,1376.16 cw(c781.25,1376.16) 781.25,1427.41 944.41,1427.41 ccw(c944.41,1478) 995,1478 995,1696 cw(c1055,1696) 1055,1756 1128.49,1756 cw(c1128.49,1703.24) 1181.25,1703.24 1181.25,1212.25 cw(c1130,1212.25) 1130,1161 770,1161 cw(c770,1201) 730,1201
GND on Top Layer "NONET_L-01_P-001" (solid, pour order 7): 2078.16,509.84 ccw(c2025,509.84) 2025,563 -72,563 ccw(c-72,492) -143,492 -143,207.26 -143,-57.48 ccw(c-43,-57.48) -43,-157.48 -39.37,-157.48 1975.34,-157.48 1978.16,-157.48 ccw(c1978.16,-57.48) 2078.16,-57.48
HEATER_2 on Top Layer "NONET_L-01_P-001" (solid, pour order 0): 180,1375.16 cw(c231.25,1375.16) 231.25,1426.41 394.41,1426.41 ccw(c394.41,1477) 445,1477 445,1695 cw(c505,1695) 505,1755 578.49,1755 cw(c578.49,1702.24) 631.25,1702.24 631.25,1211.25 cw(c580,1211.25) 580,1160 220,1160 cw(c220,1200) 180,1200
no net on Top Overlay "NONET_L02_P040" (hatched 45Degree grid 35 track 6): -157.48,689 -157.48,910 2093.45,910 2093.45,689
GND on Bottom Layer "NONET_L-01_P-001" (solid, pour order 6): -72,543 ccw(c-72,472) -143,472 -143,-57.48 ccw(c-43,-57.48) -43,-157.48 -39.37,-157.48 1975.34,-157.48 1978.16,-157.48 ccw(c1978.16,-57.48) 2078.16,-57.48 2078.16,475 ccw(c2010.16,475) 2010.16,543
HEATER_1 on Bottom Layer "NONET_L-01_P-001" (solid, pour order 4): 445,1155 ccw(c500,1155) 500,1100 592.91,1100 cw(c592.91,1052.91) 640,1052.91 640,980 cw(c600,980) 600,940 -60,940 cw(c-60,1000) -120,1000 -120,1480 cw(c-60,1480) -60,1540 130.95,1540 ccw(c130.95,1597.19) 188.14,1597.19 188.14,1660.07 188.28,1660.07 188.28,1720 cw(c248.28,1720) 248.28,1780 385,1780 cw(c385,1720) 445,1720
SOLINOID_1 on Bottom Layer "NONET_L-01_P-001" (solid, pour order 3): 1263.88,1520 cw(c1263.88,1463.88) 1320,1463.88 1320,1001.23 cw(c1258.77,1001.23) 1258.77,940 1218.86,940 959.17,940 752.92,940 cw(c752.92,982.92) 710,982.92 710,1059.86 cw(c750.14,1059.86) 750.14,1100 852.16,1100 ccw(c852.16,1140) 892.16,1140 892.4,1298.2 ccw(c850.61,1298.2) 850.61,1340 751.07,1340 cw(c751.07,1381.07) 710,1381.07 710,1730.17 cw(c759.83,1730.17) 759.83,1780 950.06,1780 cw(c950.06,1720) 1010.06,1720 1010.06,1578.2 ccw(c1068.26,1578.2) 1068.26,1520

## Other copper
Top Layer:
  rectangle net GND: 1454.72,460.93 1513.78,656.04

## Silkscreen, mask and mechanical layers (free items; w line width, h text height)
Top Overlay:
  text "AC1         AC2" at 1331.25,1352.29 h60
  text "S1           S2" at 781.25,1351.29 h60
  text "H1           H2" at 231.25,1350.54 h60
Bottom Overlay:
  drawing of 2 lines, arcs and shapes, not listed
  text "CAUTION" at 1972.58,1159.08 h100
  text "HIGH VOLTAGE" at 2074.72,1078.21 h100
Board Outline:
  lines w10: -157.48,-39.37 ccw(c-39.37,-39.37) -39.37,-157.48 1975.34,-157.48 ccw(c1975.34,-39.37) 2093.45,-39.37 2093.45,1850.39 ccw(c1975.34,1850.39) 1975.34,1968.5 -39.37,1968.5 ccw(c-39.37,1850.39) -157.48,1850.39 -157.48,-39.37 ; 185,860.5 cw(c219.5,860.5) 219.5,895 612.5,895 cw(c612.5,860.5) 647,860.5 cw(c612.5,860.5) 612.5,826 219.5,826 cw(c219.5,860.5) 185,860.5 ; 735,861.5 cw(c769.5,861.5) 769.5,896 1162.5,896 cw(c1162.5,861.5) 1197,861.5 cw(c1162.5,861.5) 1162.5,827 769.5,827 cw(c769.5,861.5) 735,861.5 ; 1393,807.86 cw(c1427.5,807.86) 1427.5,842.36 1642.5,842.36 cw(c1642.5,807.86) 1677,807.86 cw(c1642.5,807.86) 1642.5,773.36 1427.5,773.36 cw(c1427.5,807.86) 1393,807.86
Fabrication:
  drawing of 191 lines, arcs and shapes, not listed
  text "Layer" at 2697.93,1894.69 h60
  text "Name" at 3107.85,1894.69 h60
  text "Material" at 4037.59,1894.69 h60
  text "Thickness" at 4897.36,1894.69 h60
  text "Constant" at 5547.19,1894.69 h60
  text "Board Layer Stack" at 6117.06,1894.69 h60
  text "Top Overlay" at 3107.85,1774.69 h60
  text "Top Solder" at 3107.85,1654.69 h60
  text "Solder Resist" at 4037.59,1654.69 h60
  text "0.010mm" at 4897.36,1654.69 h60
  text "3.5" at 5547.19,1654.69 h60
  text "1" at 2697.93,1534.69 h60
  text "Top Layer" at 3107.85,1534.69 h60
  text "0.035mm" at 4897.36,1534.69 h60
  text "Dielectric 1" at 3107.85,1414.69 h60
  text "FR-4" at 4037.59,1414.69 h60
  text "1.500mm" at 4897.36,1414.69 h60
  text "4.6" at 5547.19,1414.69 h60
  text "2" at 2697.93,1294.69 h60
  text "Bottom Layer" at 3107.85,1294.69 h60
  text "0.035mm" at 4897.36,1294.69 h60
  text "Bottom Solder" at 3107.85,1174.69 h60
  text "Solder Resist" at 4037.59,1174.69 h60
  text "0.010mm" at 4897.36,1174.69 h60
  text "3.5" at 5547.19,1174.69 h60
  text "Bottom Overlay" at 3107.85,1054.69 h60
  text "Total board thickness:" at 2697.93,934.69 h60
  text "1.590mm" at 4897.36,934.69 h60
Drill Drawing:
  circle w10: c-46.38,2662.83 r33.33
  lines w10: -79.71,2796.17 -63.04,2796.17 -46.38,2779.5 -29.71,2796.17 -13.04,2796.17 -29.71,2812.83 -13.04,2829.5 -29.71,2829.5 -46.38,2846.17 -63.04,2829.5 -79.71,2829.5 -63.04,2812.83 -79.71,2796.17 ; -79.71,2929.5 -13.04,2929.5 -13.04,2996.17 -79.71,2996.17 -79.71,2929.5 ; -79.71,3146.17 -13.04,3146.17 -46.38,3079.5 -79.71,3146.17
  lines w15: -139.5,2584.5 6940.58,2584.5 ; -139.5,3184.5 6940.58,3184.5 ; 411.38,2434.5 411.38,3334.5 ; 951.24,2434.5 951.24,3334.5 ; 2070.91,2434.5 2070.91,3334.5 ; 2576.79,2434.5 2576.79,3334.5 ; 3310.59,2434.5 3310.59,3334.5 ; 4810.14,2434.5 4810.14,3334.5 ; 5399.99,2434.5 5399.99,3334.5 ; 6145.78,2434.5 6145.78,3334.5 ; -139.5,2434.5 6940.58,2434.5 6940.58,3334.5 -139.5,3334.5 -139.5,2434.5
  text "Symbol" at -49.5,3229.5 h72
  text "Count" at 456.38,3229.5 h72
  text "Hole Size" at 996.24,3229.5 h72
  text "Plated" at 2115.91,3229.5 h72
  text "Hole Type" at 2621.79,3229.5 h72
  text "Drill Layer Pair" at 3355.59,3229.5 h72
  text "Via/Pad" at 4855.14,3229.5 h72
  text "Pad Shape" at 5444.99,3229.5 h72
  text "Template" at 6190.78,3229.5 h72
  text "4" at 456.38,3079.5 h60
  text "118.11mil (3.000mm)" at 996.24,3079.5 h60
  text "PTH" at 2115.91,3079.5 h60
  text "Round" at 2621.79,3079.5 h60
  text "Top Layer - Bottom Layer" at 3355.59,3079.5 h60
  text "Pad" at 4855.14,3079.5 h60
  text "Rounded" at 5444.99,3079.5 h60
  text "c500h300" at 6190.78,3079.5 h60
  text "6" at 456.38,2929.5 h60
  text "62.99mil (1.600mm)" at 996.24,2929.5 h60
  text "PTH" at 2115.91,2929.5 h60
  text "Round" at 2621.79,2929.5 h60
  text "Top Layer - Bottom Layer" at 3355.59,2929.5 h60
  text "Pad" at 4855.14,2929.5 h60
  text "Rounded" at 5444.99,2929.5 h60
  text "(Mixed)" at 6190.78,2929.5 h60
  text "12" at 456.38,2779.5 h60
  text "11.81mil (0.300mm)" at 996.24,2779.5 h60
  text "PTH" at 2115.91,2779.5 h60
  text "Round" at 2621.79,2779.5 h60
  text "Top Layer - Bottom Layer" at 3355.59,2779.5 h60
  text "Via" at 4855.14,2779.5 h60
  text "Rounded" at 5444.99,2779.5 h60
  text "v60h30m0mx0" at 6190.78,2779.5 h60
  text "12" at 456.38,2629.5 h60
  text "51.18mil (1.300mm)" at 996.24,2629.5 h60
  text "PTH" at 2115.91,2629.5 h60
  text "Round" at 2621.79,2629.5 h60
  text "Top Layer - Bottom Layer" at 3355.59,2629.5 h60
  text "Pad" at 4855.14,2629.5 h60
  text "Rounded" at 5444.99,2629.5 h60
  text "c260h130" at 6190.78,2629.5 h60
  text "34 Total" at 456.38,2479.5 h60

## Dimensions
1975.34,1968.5 to 1975.34,-157.48 on Dimensions
-157.48,1850.39 to 2093.45,1850.39 on Dimensions